# Altium PCB PCB.PcbDoc (part 3 of 3)
Units mm, origin at the board's own origin, x right, y up, seen from the top; angles counter-clockwise.
Board outline 60 x 50 mm, 4 copper layers (Top Layer, Layer 3, Layer 4, Bottom Layer), stack 0.999 mm thick; 112 components, 71 nets, 399 pads, 37 vias.
Unrouted connection lines stored in the file: 18.
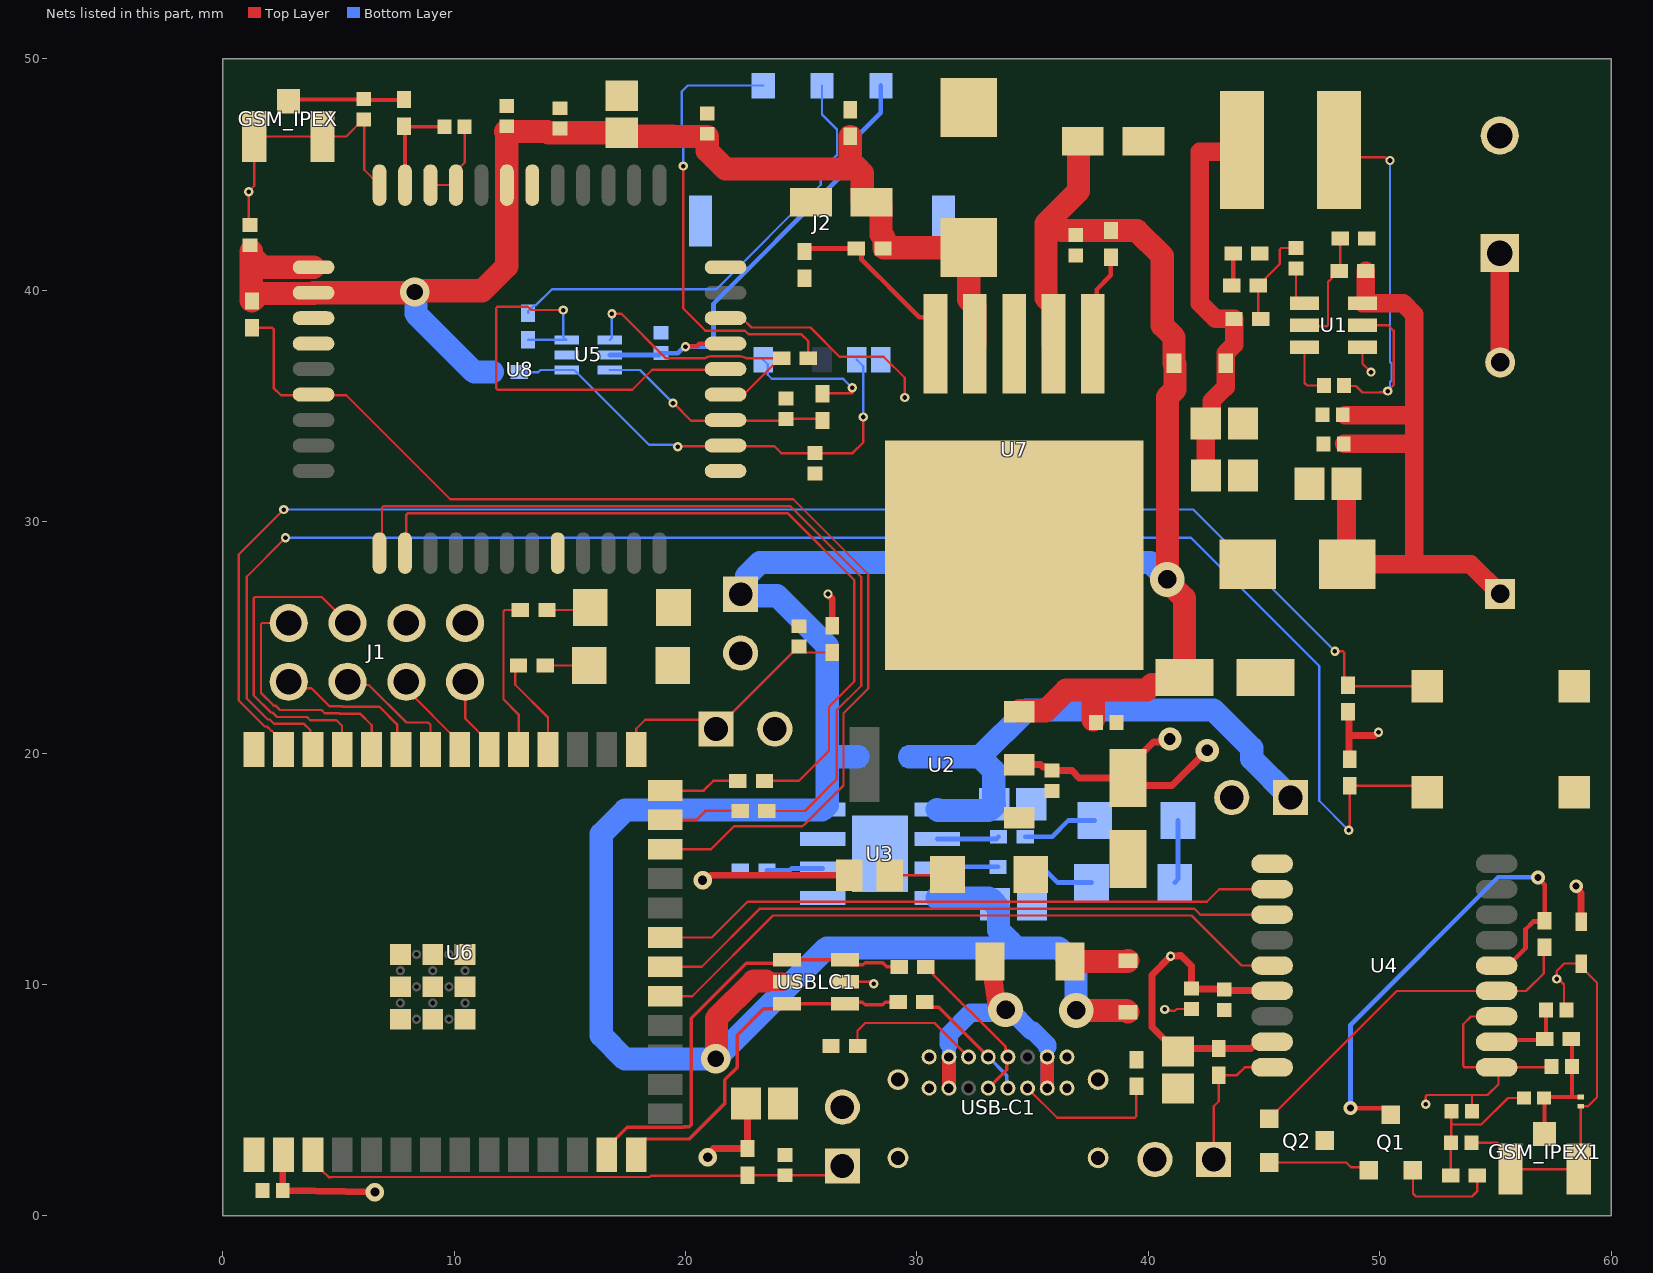
[diagram p4: the nets of this part, all layers, seen from the top]

## Via types
v1: diameter 0.4, hole 0.2, Top Layer to Bottom Layer, 24 vias
v2: diameter 1.5, hole 0.8, Top Layer to Bottom Layer, 3 vias
v3: diameter 0.6, hole 0.3, Top Layer to Bottom Layer, 3 vias
v4: diameter 0.8, hole 0.4, Top Layer to Bottom Layer, 3 vias
v5: diameter 1, hole 0.5, Top Layer to Bottom Layer, 2 vias
v6: diameter 1.27, hole 0.711, Top Layer to Bottom Layer, 2 vias

## Nets (pads, with @x,y where several pads share a name; then routed paths per layer and width w, separated by ;. In a path a pad name is that pad's centre, name@x,y a point inside that pad or via, vN(x,y) a via of type N, cw(c..) or ccw(c..) an arc to the next point about the centre after c; other vN are vias at no path point) (continued)
NetD7_1: (continued)
  Top Layer w0.1: R17.1@13.935,23.785 D7.1@15.847,23.785
NetD11_1: D11.1 R32.1 | length 2.2
  Top Layer w0.1: R32.1@13.775,26.18 15.78,26.18 D11.1@15.885,26.285
NetF2_2: F2.2 P1.1 | length 4.7
  Top Layer w0.8: P1.1@55.18,41.6 55.19,41.59 55.19,36.89 F2.2@55.2,36.88
NetJ2_C2: J2.C2 R14.2 | length 19.8
  Bottom Layer w0.1: R14.2@13.2,39.01 13.2,39.085 13.45,39.335 13.525,39.335 14.23,40.04 21.335,40.04 25.848,44.552 25.848,45.134 26.55,45.836 26.55,46.944 25.9,47.594 J2.C2@25.9,48.84
NetJ2_C3: J2.C3 R15.2 | length 19.8
  Top Layer w0.1: v1(19.9,45.36) 19.9,39.207 20.828,38.279 20.857,38.25 21.026,38.25 ccw(c21.13,38.79) 21.13,38.24 22.33,38.24 ccw(c22.33,38.79) 22.434,38.25 22.572,38.25 22.732,38.09 23.988,38.09 25.01,38.09 25.31,37.79 R15.2@25.31,37.06
  Bottom Layer w0.1: v1(19.9,45.36) 19.9,46.981 19.84,47.041 19.84,48.58 20.1,48.84 J2.C3@23.36,48.84
NetJ2_C7: J2.C7 R16.1 | length 6.1
  Top Layer w0.1: R16.1@25.92,35.51 R16.1@25.92,35.52 25.949,35.549 27.2,35.549 v1(27.2,35.78)
  Bottom Layer w0.1: J2.C7@23.36,36.99 23.551,36.799 23.551,36.349 23.73,36.17 26.81,36.17 v1(27.2,35.78)
NetQ1_1: Q1.1 Q2.2 | length 4.4
  Top Layer w0.1: Q2.2@45.22,2.31 48.55,2.31 48.76,2.1 49.41,2.1 Q1.1@49.53,1.98
NetQ1_2: Q1.2 R28.2 | length 4.6
  Top Layer w0.1: Q1.2@51.43,1.98 51.43,0.97 51.56,0.84 53.98,0.84 54.215,1.075 R28.2@54.215,1.74
NetR4_1: R4.1 R7.2 U1.5 | length 5.1
  Top Layer w0.1: U1.5@46.745,38.48 46.785,38.44 47.701,38.44 47.76,38.499 47.76,40.35 47.92,40.51 47.92,40.585 48.17,40.835 R4.1@48.245,40.835 48.285,40.875 R7.2@48.285,42.235
NetR8_1: R8.1 R9.2 | length 1.4
  Top Layer w0.2: R8.1@43.6,40.2 43.66,40.26 R9.2@43.66,41.58
NetR10_1: R10.1 U3.6 | length 2.7
  Bottom Layer w0.2: U3.6@30.875,16.285 33.425,16.285 R10.1@33.525,16.385
NetR11_1: R11.1 U3.7 | length 2.7
  Bottom Layer w0.2: U3.7@30.875,15.015 30.94,15.08 R11.1@33.505,15.08
NetR12_1: R12.1 U7.1 | length 4.1
  Top Layer w0.2: U7.1@37.6,37.685 37.768,37.853 37.768,40.028 38.38,40.64 R12.1@38.38,41.425
NetR13_2: R13.2 U3.2 | length 2.4
  Bottom Layer w0.2: R13.2@23.52,14.925 24.505,14.925 24.595,15.015 U3.2@25.925,15.015
NetR19_1: R19.1 U6.24 U8.39 | length 50.9
  Top Layer w0.1: R19.1@1.272,38.379 2.145,38.379 2.204,38.32 2.204,35.776 2.52,35.46 3.925,35.46 5.34,35.46 9.833,30.967 24.658,30.967 27.896,27.729 27.896,22.787 26.83,21.721 26.83,18.6 25.19,16.96 25.18,16.96 25.055,16.835 22.095,16.835 21.105,15.845 U6.24@19.12,15.845
NetR21_2: R21.2 U6.26 | length 3.3
  Top Layer w0.11: U6.26@19.12,18.385 19.125,18.38 20.78,18.38 21.2,18.8 R21.2@22.265,18.8
NetR22_1: R22.1 U6.25 | length 3.4
  Top Layer w0.11: U6.25@19.12,17.115 20.475,17.115 20.86,17.5 R22.1@22.365,17.5
NetR23_2: R23.2 USB-C1.A5 | length 6.2
  Top Layer w0.1: R23.2@27.435,7.34 27.435,8.005 27.77,8.34 30.76,8.34 USB-C1.A5@32.23,6.87
NetR24_2: R24.2 USB-C1.B5 | length 6.6
  Top Layer w0.1: USB-C1.B5@34.78,5.52 36.06,4.24 39.421,4.24 39.48,4.299 R24.2@39.48,5.605
NetR33_1: R33.1 R35.2 U7.5 | length 8
  Top Layer w0.2: R35.2@25.14,41.67 25.27,41.8 27.407,41.8 27.607,41.6 27.607,41.323 28.376,40.554 28.381,40.554 29.15,39.784 29.15,39.78 30.107,38.823 30.39,38.823 30.8,38.413 U7.5@30.8,37.685
NetU4_2: U4.2 U6.21 | length 27.1
  Top Layer w0.1: U6.21@19.12,12.035 21.135,12.035 22.68,13.58 42.52,13.58 43.06,14.12 U4.2@45.35,14.12
NetU4_3: U4.3 U6.20 | length 27.4
  Top Layer w0.1: U6.20@19.12,10.765 20.705,10.765 23.22,13.28 41.984,13.28 42.244,13.02 U4.3@45.35,13.02
NetU4_5: U4.5 U6.19 | length 28.6
  Top Layer w0.1: U6.19@19.12,9.495 20.295,9.495 23.78,12.98 41.86,12.98 44.02,10.82 44.4,10.82 U4.5@45.35,10.82
Pin01: J1.5 U6.37 | length 14.1
  Top Layer w0.1: U6.37@5.17,20.15 5.16,20.16 5.16,21.18 4.92,21.42 3.784,21.42 3.644,21.56 2.352,21.56 2.162,21.75 2.086,21.75 1.34,22.496 1.34,26.681 1.399,26.74 4.28,26.74 J1.5@5.4,25.62
Pin02: J1.7 U6.36 | length 10.6
  Top Layer w0.1: J1.7@2.86,25.62 1.719,25.62 1.66,25.561 1.66,22.6 2.21,22.05 2.286,22.05 2.476,21.86 4.276,21.86 4.416,21.72 5.044,21.72 5.059,21.705 5.935,21.705 6.44,21.2 U6.36@6.44,20.15
RF_IN: C18.2 R20.2 U4.11 | length 3.4
  Top Layer w0.171: U4.11@55.05,7.52 55.13,7.6 R20.2@57.085,7.6 ; R20.2@57.125,7.64 57.18,7.695 C18.2@57.18,8.9
RST: R14.1 U5.3 U8.17 | length 19.8
  Top Layer w0.1: v1(14.72,39.14) 13.334,39.14 13.184,39.29 11.879,39.29 11.82,39.231 11.82,35.759 11.879,35.7 17.7,35.7 18.56,36.56 U8.17@21.84,36.56
  Bottom Layer w0.1: R14.1@13.2,37.86 14.85,37.86 14.72,37.99 v1(14.72,39.14)
RST_GPS: P5.1 R27.1 U4.9 | length 6.2
  Top Layer w0.1: P5.1@42.82,2.44 42.82,4.74 43.04,4.96 R27.1@43.04,6.085 43.825,6.085 44.16,6.42 U4.9@45.35,6.42
RX2: R21.1 U8.2 | length 33.4
  Top Layer w0.1: U8.2@7.94,28.66 7.94,30.308 7.999,30.367 24.409,30.367 27.296,27.48 27.296,23.095 26.2,21.999 26.2,20.1 24.9,18.8 R21.1@23.415,18.8
SIM_DATA: C25.2 R16.2 U5.6 U8.15 | length 10.2
  Top Layer w0.1: v1(19.46,35.12) 19.48,35.12 20.24,34.36 21.84,34.36 24.26,34.36 C25.2@24.34,34.44 25.85,34.44 R16.2@25.92,34.37
  Bottom Layer w0.1: U5.6@16.73,36.55 18.03,36.55 v1(19.46,35.12)
SIM_DET: C26.2 J2.SW R18.2 U5.1 U8.14 | length 20.3
  Top Layer w0.1: v1(19.66,33.24) 19.67,33.25 21.97,33.25 21.98,33.26 23.84,33.26 24.14,32.96 C26.2@25.6,32.96 27.22,32.96 27.68,33.42 v1(27.68,34.52)
  Bottom Layer w0.1: R18.2@12.815,36.46 13.64,36.46 13.73,36.55 U5.1@14.86,36.55 15.195,36.55 18.425,33.32 19.451,33.32 19.474,33.297 19.603,33.297 v1(19.66,33.24) ; J2.SW@27.4,36.99 27.68,36.71 v1(27.68,34.52)
TCK: J1.2 U6.32 | length 3.4
  Top Layer w0.1: J1.2@10.48,23.08 10.48,21.49 11.52,20.45 U6.32@11.52,20.15
TDI: J1.6 U6.34 | length 5.4
  Top Layer w0.1: J1.6@5.4,23.08 5.536,22.944 6.316,22.944 7.94,21.32 8.88,21.32 8.98,21.22 U6.34@8.98,20.15
TDO: J1.4 U6.33 | length 3.9
  Top Layer w0.1: J1.4@7.94,23.08 7.94,22.76 10.25,20.45 U6.33@10.25,20.15
TMS: J1.8 U6.35 | length 6.6
  Top Layer w0.1: J1.8@2.86,23.08 3.135,22.805 3.835,22.805 4.62,22.02 5.169,22.02 5.184,22.005 6.775,22.005 7.54,21.24 7.54,20.32 U6.35@7.71,20.15
TX2: R22.2 U8.1 | length 36.8
  Top Layer w0.1: U8.1@6.89,28.61 6.89,30.608 6.949,30.667 24.534,30.667 27.596,27.605 27.596,22.912 26.53,21.846 26.53,18.87 25.16,17.5 R22.2@23.515,17.5
US_N: R26.2 USB-C1.A7 USB-C1.B7 | length 7.1
  Top Layer w0.11: R26.2@30.38,10.76 30.455,10.76 30.7,10.515 30.7,10.44 33.827,7.313 33.827,6.973 USB-C1.A7@33.93,6.87
  Top Layer w0.149: USB-C1.B7@33.08,5.52 33.882,6.322 33.882,6.822 USB-C1.A7@33.93,6.87
US_P: R25.2 USB-C1.A6 USB-C1.B6 | length 9.1
  Top Layer w0.11: R25.2@30.415,9.24 R25.2@30.34,9.24 30.585,8.995 30.955,8.995 USB-C1.A6@33.08,6.87
  Top Layer w0.149: R25.2@30.415,9.24 30.641,9.014 30.936,9.014 USB-C1.A6@33.08,6.87
  Bottom Layer w0.149: USB-C1.A6@33.08,6.87 33.882,6.068 33.882,5.568 USB-C1.B6@33.93,5.52
USBC_N: R26.1 U6.13 USBLC1.3 USBLC1.4 | length 19.2
  Top Layer w0.149: U6.13@16.6,2.65 16.6,2.95 17.491,3.841 19.922,3.841 19.93,3.849 20.164,3.849 20.251,3.936 20.251,8.546 22.626,10.921 24.236,10.921 USBLC1.4@24.385,11.07 USBLC1.3@26.895,11.07 27.116,10.849 27.666,10.849 27.76,10.944 28.513,10.944 28.697,10.76 R26.1@29.23,10.76
USBC_P: R25.1 U6.14 USBLC1.1 USBLC1.6 | length 15.7
  Top Layer w0.149: U6.14@17.87,2.65 17.87,2.95 18.246,3.326 20.164,3.326 21.696,4.857 21.696,5.879 22.23,6.414 22.23,7.81 23.37,8.949 24.164,8.949 USBLC1.6@24.385,9.17 USBLC1.1@26.895,9.17 26.965,9.24 27.645,9.24 27.76,9.125 28.513,9.125 28.628,9.24 R25.1@29.19,9.24
V_B: F1.1 USB-C1.A4 USB-C1.A9 USB-C1.B4 USB-C1.B9 | length 14.6
  Top Layer w0.6: USB-C1.B9@31.38,5.52 USB-C1.A4@31.38,6.87 ; USB-C1.B4@35.63,5.52 USB-C1.A9@35.63,6.87
  Top Layer w0.8: F1.1@33.16,11 33.229,10.575 33.474,9.066 33.631,8.909 v2(33.829,8.909)
  Bottom Layer w0.6: USB-C1.B9@31.38,5.52 USB-C1.A4@31.38,6.87 31.38,7.43 ; USB-C1.B4@35.63,5.52 USB-C1.A9@35.63,6.87 35.63,7.32
  Bottom Layer w0.8: 31.38,7.43 31.38,7.837 32.318,8.775 33.695,8.775 v2(33.829,8.909) 34.018,8.909 34.933,7.995 35.022,7.995 35.63,7.387 35.63,7.32
VBAT: C14.2 D4.2 P6.1 U3.5 | length 24.1
  Bottom Layer w1: D4.2@29.675,19.84 32.714,19.84 ; U3.5@30.875,17.555 30.915,17.515 33.075,17.515 33.14,17.58 33.19,17.58 33.34,17.73 C14.2@33.34,17.78 33.321,17.799 33.321,19.233 32.714,19.84 ; P6.1@46.14,18.08 44.466,19.754 44.466,20.213 42.819,21.86 34.734,21.86 32.714,19.84
VCC: C27.2 J2.C1 U5.5 U8.18 | length 20.7
  Top Layer w0.2: v1(20,37.56) 20.02,37.58 20.5,37.58 20.6,37.68 21.82,37.68 U8.18@21.84,37.66
  Bottom Layer w0.2: U5.5@16.73,37.2 18.86,37.2 C27.2@18.94,37.28 19.666,37.28 19.946,37.56 v1(20,37.56) 21.09,37.56 21.21,37.68 21.21,39.42 26.6,44.81 26.6,45.391 26.9,45.691 26.9,46.124 28.44,47.664 J2.C1@28.44,48.84
VCC_RF: Q1.3 R30.2 U4.14 | length 21.5
  Top Layer w0.2: v3(48.735,4.661) 50.199,4.661 Q1.3@50.48,4.38 ; U4.14@55.05,10.82 55.55,10.82 56.293,11.563 56.293,12.376 56.637,12.72 57.085,12.72 R30.2@57.12,12.755 57.12,14.31 56.839,14.591 v3(56.839,14.627)
  Bottom Layer w0.2: v3(48.735,4.661) 48.735,8.255 55.107,14.627 v3(56.839,14.627)
VDD: C20.1 C21.2 C22.2 C24.2 C34.2 C37.1 C38.2 R18.1 R19.2 R33.2 R34.2 U7.4 U8.28 U8.34 U8.35 | length 57.6
  Top Layer w1: R19.2@1.24,39.561 1.24,40.99 C34.2@1.24,41.68 ; 1.26,41.46 1.73,40.99 U8.34@3.93,40.99 ; R19.2@1.272,39.529 1.603,39.86 3.925,39.86 3.955,39.89 8.27,39.89 8.352,39.972 11.212,39.972 12.275,41.035 12.275,46.805 12.22,46.86 14.02,46.86 14.08,46.8 14.58,46.8 C21.2@17.24,46.8 17.39,46.65 19.44,46.65 19.45,46.64 20.94,46.64 20.94,46.026 21.726,45.24 27.454,45.24 ; R34.2@27.12,46.645 27.12,45.574 27.454,45.24 ; U7.4@32.5,37.685 32.5,39.335 32.24,39.595 C37.1@32.24,41.835 28.57,41.835 28.57,42.28 28.44,42.41 28.44,43.685 28.325,43.8 C20.1@28.04,43.8 27.755,43.8 27.64,43.915 27.64,45.054 27.454,45.24
  Bottom Layer w1: v6@8.3,39.847 8.352,39.795 8.352,38.988 10.88,36.46 R18.1@11.665,36.46
  other v6: 8.3,39.92
Vin: C9.1 C13.2 C15.2 C35.1 C36.2 D4.1 D5.1 D8.1 P4.1 R12.2 U2.3 U3.4 U3.8 U7.2 USBLC1.5 | length 131.4
  Top Layer w0.8: 23.472,10.147 23.498,10.12 USBLC1.5@24.18,10.12
  Top Layer w1: v6(21.315,6.785) 21.337,6.807 21.337,8.537 22.947,10.147 23.472,10.147 ; U2.3@34.425,21.79 34.46,21.825 35.556,21.825 36.451,22.72 37.62,22.72 ; U7.2@35.9,37.685 35.89,37.695 35.89,39.345 35.58,39.655 35.58,42.885 ; v2(36.88,8.88) 39.045,8.88 D5.1@39.12,8.805 ; C35.1@37.17,46.44 37.09,46.44 36.975,46.325 36.975,44.28 35.58,42.885 ; C15.2@37.62,21.44 37.62,22.72 ; v2@40.82,27.427 41.56,26.687 C9.1@41.56,23.26 ; v2(40.82,27.5) 40.82,35.38 41.145,35.705 D8.1@41.145,36.8 ; C9.1@41.063,23.038 40.985,22.96 40.155,22.96 39.915,22.72 37.62,22.72 ; D8.1@41.105,36.84 41.114,36.849 41.114,37.962 40.6,38.476 40.6,41.48 39.505,42.575 R12.2@38.38,42.575 36.245,42.575 36.12,42.7 35.765,42.7 35.58,42.885
  Bottom Layer w1: v6@21.31,6.78 17.38,6.78 16.36,7.8 16.36,16.5 17.396,17.536 25.906,17.536 U3.4@25.925,17.555 26.125,17.755 26.125,19.765 ; v6(21.315,6.785) 26.11,11.58 33.665,11.58 ; D4.1@27.445,19.84 26.2,19.84 26.125,19.765 ; U3.8@30.875,13.745 33.095,13.745 33.18,13.66 33.23,13.66 33.38,13.51 C13.2@33.38,13.46 33.53,13.31 33.53,12.35 34.032,11.848 34.3,11.58 ; 33.765,11.58 34.3,11.58 ; v2(36.88,8.88) 36.88,10.82 36.12,11.58 34.3,11.58 ; v2(40.82,27.5) 40.08,28.24 23.226,28.24 22.64,27.654 22.64,27.12 P4.1@22.38,26.86 22.445,26.795 23.957,26.795 26.125,24.627 26.125,19.765
Vout: C10.2 C11.2 D8.2 L1.2 R5.2 | length 17.4
  Top Layer w0.8: C11.2@42.495,31.992 42.488,31.999 42.488,34.232 C10.2@42.48,34.24 42.73,34.49 42.73,35.21 43.335,35.815 43.335,37.275 43.7,37.64 R5.2@43.7,38.76 43.335,38.76 42.9,38.76 42.22,39.44 42.22,45.971 43.951,45.971 L1.2@44.04,46.06
VUSB: D5.2 F1.2 | length 2.5
  Top Layer w1: F1.2@36.61,11 39.085,11 D5.2@39.12,11.035
pads on no net: J2.C6 U2.4 U4.4 U4.7 U4.15 U4.16 U4.17 U4.18 U6.4 U6.5 U6.6 U6.7 U6.8 U6.9 U6.10 U6.11 U6.12 U6.15 U6.16 U6.17 U6.18 U6.22 U6.23 U6.28 U6.29 U6.41_10 U6.41_11 U6.41_12 U6.41_13 U6.41_14 U6.41_15 U6.41_16 U6.41_17 U6.41_18 U6.41_19 U6.41_20 U6.41_21 U8.3 U8.4 U8.5 U8.6 U8.7 U8.9 U8.10 U8.11 U8.12 U8.20 U8.22 U8.23 U8.24 U8.25 U8.26 U8.29 U8.38 U8.40 U8.41 U8.42 USB-C1.A8 USB-C1.B8

## Polygon pours and split planes (outlines as drawn)
GND on Bottom Layer "GND_L04_P000" (solid, remove dead copper, pour order 0): 0.52,12.14 11.68,12.14 11.68,7.8 0.52,7.8 0.52,0.57 59.53,0.57 59.53,49.47 10.12,49.48 0.52,49.48
GND on Top Layer "GND_L01_P002" (solid, remove dead copper, pour order 2): 10.16,49.46 10.16,43.1 0.52,43.203 0.52,0.58 56.38,0.58 56.4,0.56 56.42,0.58 56.42,3.56 54.6,3.56 54.59,3.57 54.59,5.02 53.14,5.02 53.14,6.02 53.14,16 59.62,16 59.67,16.05 59.67,49.47
3V3 on Layer 4 (split plane): 59.49,0.51 0.51,0.51 0.51,49.49 59.49,49.49
GND on Layer 3 (split plane): 59.49,0.51 0.51,0.51 0.51,49.49 59.49,49.49

## Keep-outs
Bottom Layer:
  rectangle: 1.75,47.184 4,49.25
  rectangle: 7,43.2 8.75,45.75

## Other copper
Layer 3 (plane layer: these items are gaps in the copper):
  pour cut-out: 7,45.75 7,43.2 8.75,43.2 8.75,45.75
  pour cut-out: 1.75,49.25 4,49.25 4,47.184 1.75,47.184
  pour cut-out: 7.32,45.62 7.32,43.42 8.44,43.42 8.44,45.62
Layer 4 (plane layer: these items are gaps in the copper):
  pour cut-out: 7,45.75 7,43.2 8.75,43.2 8.75,45.75
  pour cut-out: 1.75,49.25 4,49.25 4,47.184 1.75,47.184
  pour cut-out: 7.32,45.62 7.32,43.42 8.44,43.42 8.44,45.62

## Silkscreen, mask and mechanical layers (free items; w line width, h text height)
Mechanical 1:
  the board outline again, w0.254

## Text inside footprints (layer, text, board x,y; h text height)
U6: Mechanical 4 "ANTENNA" at -2.63,6.9 h1.88 r90; Mechanical 4 "ANTENNA" at -2.63,6.9 h1.88 r90